# Altium PCB IG-1.PCBDOC (part 2 of 2)
Units mil, origin at the board's own origin, x right, y up, seen from the top; angles counter-clockwise.
Board outline 1834.65 x 964.57 mil, 4 copper layers (Top, GND Plane, Mid1-Ver, Bottom), stack 61.6 mil thick; 29 components, 33 nets, 366 pads, 256 vias.
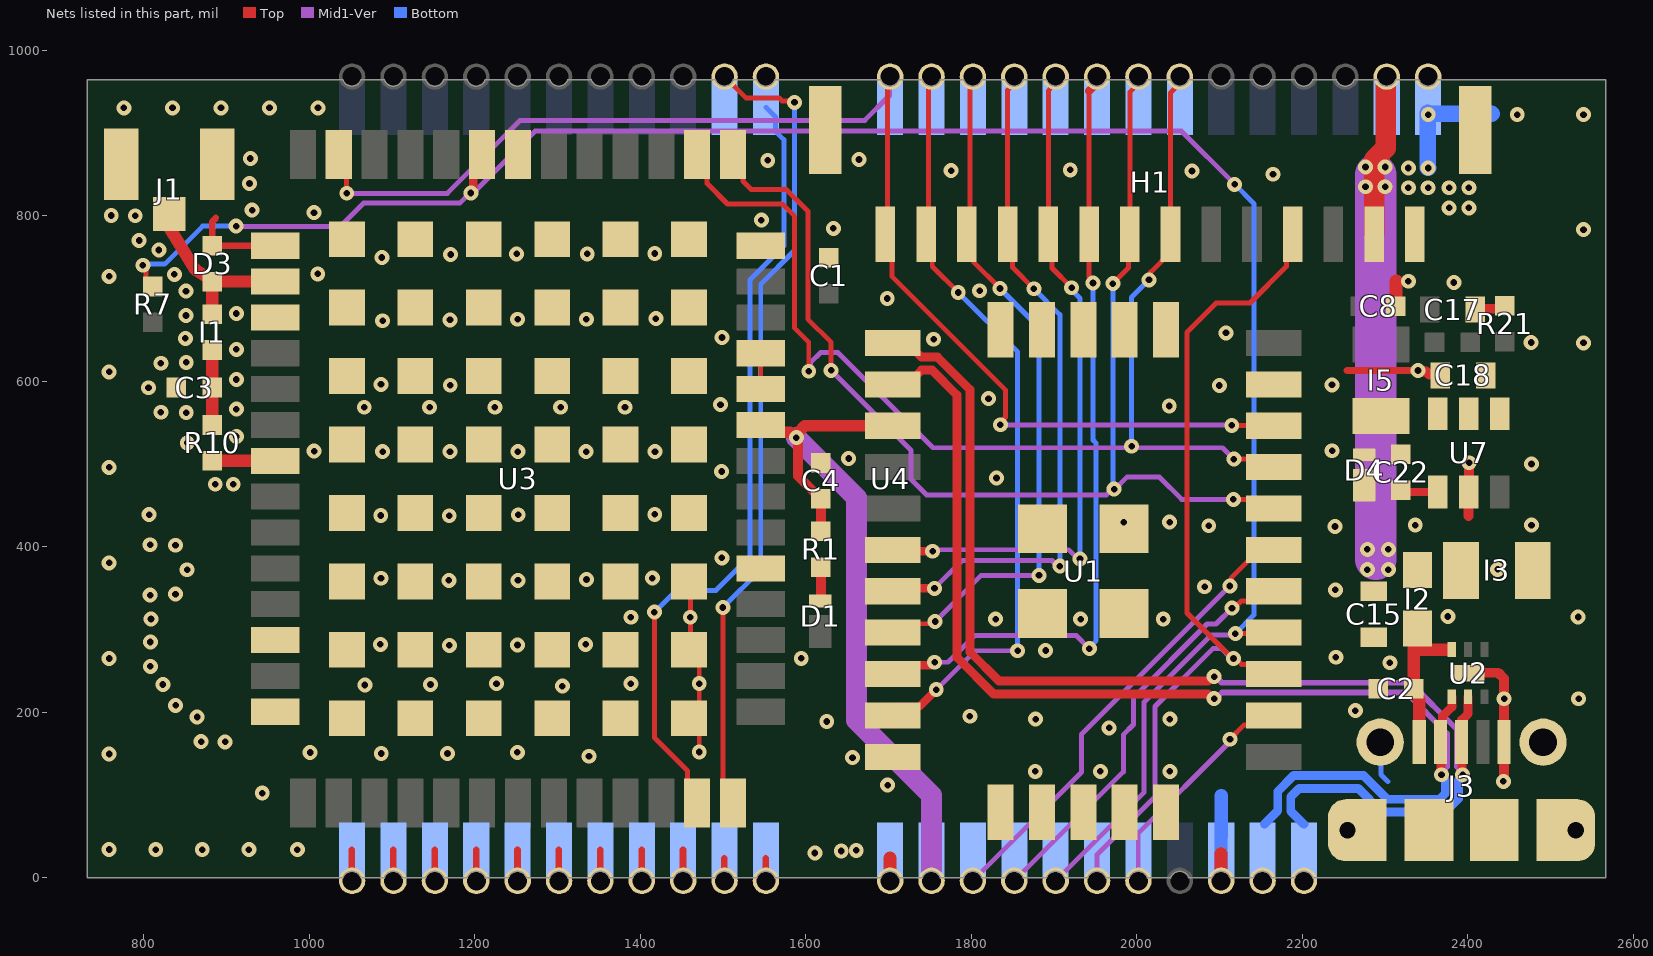
[diagram p4: the nets of this part, all layers, seen from the top]

## Via types
v1: diameter 18, hole 8, Top to Bottom, 256 vias

## Nets (pads, with @x,y where several pads share a name; then routed paths per layer and width w, separated by ;. In a path a pad name is that pad's centre, name@x,y a point inside that pad or via, vN(x,y) a via of type N, cw(c..) or ccw(c..) an arc to the next point about the centre after c; other vN are vias at no path point) (continued)
G3/Tx0: H1.7 U1.19 U3.43 U4.7 | length 1466
  Top w6: U3.43@1469,874.04 1480.74,862.29 1480.74,839.08 1505.54,814.28 1571.75,814.28 1586.8,799.23 1586.8,664.2 1603.76,647.24 v1(1603.76,612.21) ; v1(2014.87,722.51) 2016.79,724.42 2016.79,731.92 2040.82,755.95 2040.82,948.55 2051.87,959.6 U4.7@2051.87,966.09 ; v1(2117.42,505.96) 2163.05,505.96 U1.19@2172.68,496.33
  Mid1-Ver w6: v1(1603.76,612.21) 1605.68,614.12 1605.68,622.32 1617.94,634.59 1639.02,634.59 1753.88,519.72 1991.9,519.72 v1(1993.78,521.6) ; v1@1993.78,519.72 2103.65,519.72 v1(2117.42,505.96)
  Bottom w6: v1(1993.78,521.6) 1993.78,701.41 v1(2014.87,722.51)
G4/Rx0: H1.8 U1.18 U3.42 U4.8 | length 1493.6
  Top w6: U3.42@1512.3,874.04 1524.05,862.29 1524.05,842.03 1534.26,831.82 1576.63,831.82 1602.76,805.69 1602.76,675.17 1630.8,647.13 v1(1630.8,613.14) ; v1@1971.13,471.4 v1(1972.78,469.75) ; v1@1971.13,718.18 1989.78,736.83 1989.78,775.78 H1.8@1991.61,777.61 1991.61,949.34 2001.87,959.6 U4.8@2001.87,966.09 ; v1(2116.7,457.32) 2161.68,457.32 U1.18@2172.68,446.33
  Mid1-Ver w6: v1(1630.8,613.14) 1727.5,516.44 1727.5,481.45 1746.05,462.9 1963.23,462.9 1970.08,469.75 1973.67,469.75 1988.08,484.16 2027.48,484.16 2054.32,457.32 v1(2116.7,457.32)
  Bottom w6: v1@1971.13,471.4 v1@1971.13,718.18
  other v1: 1971.13,718.04
G5/SCLK/STROBE: H1.9 U1.9 U4.9 | length 970.1
  Top w6: 1942.4,950.66 H1.9@1942.4,777.61 1942.5,777.5 1942.5,726.16 1947.16,721.5 v1(1947.16,718.79) ; v1@1942.6,277.28 v1(1942.81,277.08)
  Top w10: U1.9@1698.27,246.33 1709.01,257.08 1750.2,257.08 1753.72,260.6 v1(1755.89,260.6) ; 1942.4,950.66 1951.87,960.14 U4.9@1951.87,966.09
  Mid1-Ver w6: v1(1755.89,260.6) 1772.04,260.6 1804.29,292.85 1927.04,292.85 v1(1942.81,277.08)
  Bottom w6: v1@1942.81,277.49 1942.81,278.64 1950.94,286.76 1950.94,525.26 1947.16,529.04 v1(1947.16,718.79)
G6/Rx1/MOSI: H1.10 U1.6 U4.10 | length 838.6
  Top w6: U4.10@1901.87,966.09 1901.87,959.6 1893.18,950.91 H1.10@1893.18,777.61 1897.72,773.07 1897.72,736.83 v1@1921.39,713.16
  Top w10: U1.6@1698.27,396.33 1699.85,394.75 v1(1753.51,394.75)
  Mid1-Ver w6: v1@1754,394.75 1755.75,396.5 1917.77,396.5 1928.74,385.54 v1(1931.44,385.54)
  Bottom w6: v1@1921.39,713.16 1921.39,710.32 1931.44,700.26 v1(1931.44,385.54)
  other v1: 1921.39,713.02
G7/Tx1/MISO: H1.11 U1.7 U4.11 | length 845.7
  Top w6: U4.11@1851.87,966.09 1851.87,959.6 1843.97,951.7 H1.11@1843.97,777.61 1850.2,771.38 1850.2,737.59 1875.78,712.01 v1(1875.78,711.87)
  Top w10: U1.7@1698.27,346.33 1701.85,349.92 v1(1755.64,349.92)
  Mid1-Ver w6: v1@1756.13,349.92 1756.13,350.41 1789.22,383.5 1897.65,383.5 1904.41,376.75 v1(1907.11,376.75)
  Bottom w6: v1@1875.85,711.94 1875.85,711.8 1907.11,680.54 v1(1907.11,376.75)
G8/C\S\/STROBE: H1.12 U1.8 U4.12 | length 853
  Top w6: U1.8@1698.27,296.33 1709.01,307.08 1751.48,307.08 1754.27,309.86 v1(1756.43,309.86) ; U4.12@1801.87,966.09 1798.31,962.54 1798.31,781.16 H1.12@1794.76,777.61 1802.57,769.8 1802.57,744.54 v1@1834.87,712.24
  Mid1-Ver w6: v1@1755.35,309.86 v1(1756.43,309.86) 1812.07,365.5 v1(1881.9,365.5)
  Bottom w6: v1(1834.79,712.17) 1881.9,665.07 v1(1881.9,365.5)
G9/S\P\I\_\E\N\/STROBE: H1.13 U1.10 U4.13 | length 938.6
  Top w6: U1.10@1692.45,190.51 U1.10@1698.27,196.33 ; U4.13@1751.87,966.09 1748.71,962.93 1748.71,780.77 H1.13@1745.55,777.61 1752.98,770.17 1752.98,738.8 1784.35,707.43 v1(1784.35,707.29)
  Top w10: U1.10@1698.27,196.33 1709.01,207.08 1737.39,207.08 v1(1757.86,227.55)
  Mid1-Ver w6: v1(1757.86,227.55) 1804.8,274.48 v1(1856.15,274.48)
  Bottom w6: v1@1784.42,707.36 1856.15,635.63 v1(1856.15,274.48)
G10/CHIP_ERASE: U1.17 U4.17 | length 567.8
  Top w6: v1(2112.46,352.67) 2114.37,354.58 2114.37,362.63 2148.07,396.33 U1.17@2172.68,396.33
  Mid1-Ver w6: U4.17@1802.09,-3.54 1933.3,127.67 1933.3,173.52 v1(2112.46,352.67)
G11/SWDIO: U1.16 U4.18 | length 510.9
  Top w6: v1(2115.07,325.93) 2117.78,325.93 2126.44,334.58 2160.93,334.58 U1.16@2172.68,346.33
  Mid1-Ver w6: U4.18@1852.09,-3.54 1983.78,128.15 1983.78,173.08 1996.03,185.33 1996.03,217.86 2084.88,306.71 2095.85,306.71 v1(2115.07,325.93)
G13/DRDY/XSDA: H1.4 U1.14 U4.20 | length 1037.4
  Top w6: v1@2115.64,265.12 2060.68,320.09 2060.68,659.2 2096.05,694.57 2136.77,694.57 2181.01,738.81 2181.01,770.16 H1.4@2188.46,777.61 ; v1(2116.99,265.12) 2119.7,265.12 2126.74,258.08 2154.04,258.08 U1.14@2165.79,246.33
  Mid1-Ver w6: U4.20@1952.09,-3.54 1952.09,28.07 2022.03,98.02 2022.03,207.09 2092.34,277.39 2102.02,277.39 2114.29,265.12 v1(2116.99,265.12)
G14/SWCLK: U1.13 U4.21 | length 289.1
  Top w6: v1(2112.65,167.51) 2112.65,167.84 2129.39,184.58 2160.93,184.58 U1.13@2172.68,196.33
  Mid1-Ver w6: U4.21@2001.86,-3.54 2001.86,54.01 2112.65,164.8 v1(2112.65,167.51)
GND: C1.2 C2.2 C3.2 C4.2 C8.2 C15.2 C17.2 C18.2 D3.2 D4.A H1.0 H1.1 J1.2 J1.3 J3.5 J3.6 J3.7 J3.8 J3.9 R21.1 U1.0 U1.11 U1.21 U1.23 U1.24 U2.7 U3.1 U3.3 U3.12 U3.14 U3.32 U3.37 U3.38 U3.41 U3.48 U3.55 U4.1 U4.15 U4.23 U4.37 U4.38 U4.39 U4.40 U4.41 U4.42 U4.43 U4.44 U4.45 U4.46 U4.47 U7.2 | length 1380.8
  Top w6: U3.55@1460.63,277.09 v1(1460.63,314.96) U3.55@1460.63,356.81 ; v1(1471.47,152.09) U3.55@1471.47,180.62 ; U3.55@1471.47,205.25 v1(1471.47,234.77) U3.55@1471.47,263.3 ; U3.37@1545.77,590.57 U3.38@1545.77,633.88 ; v1@1655.85,144.52 v1(1656.62,145.29)
  Top w8: 887.56,797.48 883.07,792.99 D3.2@883.07,763.78 U3.1@959.15,763.8 ; U4.37@1051.86,6.3 1051.86,33.86 ; U4.38@1101.86,6.3 1101.86,33.86 ; U4.39@1151.86,6.3 1151.86,33.86 ; U4.40@1201.86,6.3 1201.86,33.86 ; U4.41@1251.86,6.3 1251.86,33.86 ; U4.42@1301.86,6.3 1301.86,33.86 ; U4.43@1351.86,6.3 1351.86,33.86 ; U4.44@1401.86,6.3 1401.86,33.86 ; U4.45@1451.86,6.3 1451.86,33.86 ; U4.46@1501.86,-3.54 1501.86,24.02 ; U4.47@1551.86,-3.54 1551.86,24.02
  Top w9: 2254.36,613.08 v1@2342.63,613.08
  Top w11.81: v1(2339.75,613.08) 2340.94,611.89 2349.91,611.89 2353.85,607.95
  Top w12: U2.7@2400.37,247.46 2400.83,247.92 2436.71,247.92 2443.74,240.89 v1@2443.74,124.74 ; 2401.09,437.33 U7.2@2401.09,466.22 2401.32,466.45 2401.32,501.41 v1(2401.55,501.65) ; C17.2@2408.96,686.69 2409.95,687.68 2443.41,687.68 R21.1@2444.4,688.66
  Top w16: U4.15@1701.86,-3.54 1701.86,24.02 ; U4.23@2101.86,-3.54 2101.95,29.11 ; C8.2@2313.17,690.61 2313.17,720.74 2313.9,720.74
  Bottom w6: J3.6@2294.09,164.05 J3.6@2299.83,158.31 ; J3.6@2295.12,154.69 2295.12,124.79 2303.32,116.59
  Bottom w16: U4.23@2101.86,-3.54 2102.14,99.62
  Bottom w20: v1(2351.99,857.77) 2351.86,857.9 2351.86,924.21 2352.73,923.34 2428.62,923.34
  other v1: 1611.17,30.12 1643.04,32.57 1661.21,33.33 758.55,34.36 814.8,34.21 871.06,34.21 927.31,34.21 985.94,34.21 943.48,102.5 1699.04,112.21 2443.02,116.68 1877.38,128.72 1956.12,128.72 2040.03,128.72 1338.29,147.05 758.55,149.77 1087.24,150.39 1167.37,150.39 1001.3,151.54 1251.69,151.7 898.68,164.33 869.68,164.64 1966.61,181.37 1625.52,188.99 1877.93,191.82 2040.03,191.83 864.88,194.47 1798.48,195.36 2264.13,202.07 838.94,208.53 2443.85,216.45 2533.91,216.45 1306.11,231.68 1067.44,233.16 823.48,233.73 1146.75,233.7 1226.55,234.77 1388.79,234.77 808.33,255.63 2305.75,259.95 758.55,265.18 1594.68,265.22 2240.64,266.61 1889.92,274.85 1169.53,280.93 1251.95,281.41 1086.27,282.16 1334.13,282.12 808.3,285.07 809.17,312.82 1829.51,312.73 1932.15,312.73 2032.06,312.73 1388.79,314.96 2533.21,315.23 2375.99,315.88 808.01,341.73 838.64,342.83 2239.91,347.97 2082.11,351.78 1169.06,359.53 1252.43,359.53 1335.33,360.61 1086.95,362.11 1414.76,362.16 852.75,372.33 2436.11,372.81 758.55,380.59 1498.78,386.74 838.64,401.95 808.01,402.52 2086.99,425.46 2239.55,424.61 2336.54,426.26 2476.92,426.21 1984.52,429.64 2039.72,429.93 1086.65,437.9 1169.45,437.54 806.86,439 1252.77,438.75 1417.67,439.28 886.74,475.58 908.5,475.59 1830.52,483.25 1498.56,491.03 758.55,496 2476.92,500.11 1651.91,506.75 1089.03,515.05 1170.38,515.05 1252.26,515.05 1334.87,515.05 1417.94,515.05 1006.21,515.71 2236.13,516.08 852.88,525.63 912.31,533.28 851.72,562.11 821.09,562.68 912.31,566.33 1066.76,568.71 1145.81,568.71 1224.5,568.71 1303.99,568.71 1381.8,568.71 2039.31,570.23 1497.13,571.86 1820.91,579.08 806.15,592.24 1170.68,595.19 2099.8,594.89 1087.04,596.25 2235.91,595.74 912.31,602.25 758.55,611.41 821.09,621.8 851.72,622.89 912.31,638.58 2539.77,646.42 2476.53,646.94 1754.59,650.84 850.57,651.8 1498.95,652.92 2107.88,658.55 1088.89,673.1 1170.39,674.27 1252,674.95 1335.15,674.95 1419.09,675.72 851.43,679.56 912.31,681.88 1698.58,700.04 851.41,709 1810.14,709.39 2383.13,719.4 2328.2,720.86 758.55,726.82 837.35,729.17 1010.62,729.83 1088.01,749.61 1171.17,753.16 1250.83,754.03 1336.22,754.03 1417.73,754.42 818.68,758.58 794.85,770.15 2539.77,783.29 1633.54,784.73 1546.57,794.7 761.06,800.3 790.06,799.99 1005.97,803.79 931.26,806.77 2377.43,809.47 2401.22,809.47 2328.21,833.87 2351.99,833.87 2377.43,833.87 2401.22,833.87 928.18,838.93 2164.71,850.21 2066.71,854.11 1775.74,854.54 1919.71,855.41 2328.21,857.77 1554.25,866.93 1664.44,867.98 929.13,869.17 2352.15,922.13 2459.72,922.13 2539.77,922.13 776.41,930.36 835.03,930.36 893.66,930.36 952.29,930.36 1010.91,930.36
GPS1_ANT: D3.1 I1.1 J1.1 U3.2 | length 206.3
  Top w14.9: J1.1@831.2,802.19 829.83,796.43 829.42,794.72 829.42,788.76 861.42,736.69 863.78,734.33 878.7,724.7 D3.1@883.07,720.47 I1.1@883.07,681.1 ; D3.1@894.19,720.49 U3.2@959.15,720.49
GPS1_RX2: U3.26 U4.26 | length 961.1
  Top w6: v1(1417.32,321.05) 1417.32,169.29 1457.25,129.37 1457.25,102.32 U3.26@1469,90.57
  Bottom w6: v1(1417.32,321.05) 1443.48,347.21 1491.43,347.21 1532.76,388.55 1532.76,722.56 1564.72,754.52 ; U4.26@1552.09,931.1 1563.83,919.35 1563.83,901.64 1573.61,891.86 1573.61,763.41 1566.52,756.32
GPS1_TX2: U3.27 U4.27 | length 984.8
  Top w6: v1(1500,326.77) 1500,102.88 U3.27@1512.3,90.57 ; U4.27@1502.09,968.11 1527.7,942.5 1567.83,942.5 1571.41,938.92 1584.7,938.92 v1(1586.61,937.01)
  Bottom w6: v1(1500,326.77) 1545.76,372.53 1545.76,717.18 1586.61,758.03 v1(1586.61,937.01)
GPS.TIMEPULSE: H1.14 U1.20 U3.53 U4.14 | length 1599.9
  Top w6: U3.53@1035.93,874.04 1045.55,864.41 v1(1045.55,827.18) ; U4.14@1701.87,966.09 1699.1,963.32 1699.1,780.38 H1.14@1696.33,777.61 1704.14,769.8 1704.14,726.75 1841.21,589.68 1841.21,556.2 1835.2,550.18 v1(1835.2,547.47) ; v1(2114.78,546.84) 2172.17,546.84 U1.20@2172.68,546.33
  Mid1-Ver w6: v1(1045.55,827.18) 1167.21,827.18 1255.4,915.37 1671.51,915.37 1701.37,945.23 1701.37,967.39 U4.14@1702.09,968.11 ; v1(1835.2,547.47) 1835.27,547.4 v1@2114.78,547.4
GPS_RESET_N: R7.2 U1.15 U3.49 U4.19 | length 2516.7
  Top w6: v1(799.21,740.16) 799.21,737.45 803.21,733.45 803.21,722.38 R7.2@811.02,714.57 ; v1(2119.1,295.21) 2171.56,295.21 U1.15@2172.68,296.33
  Top w10: v1(1195.52,827.44) 1195.52,829.6 1198.41,832.48 1198.41,863.29 U3.49@1209.15,874.04
  Mid1-Ver w6: v1(911.88,787.41) 912.5,786.79 1037.45,786.79 1065.84,815.18 1182.32,815.18 1194.58,827.44 v1(1195.52,827.44) 1198.23,827.44 1273.16,902.37 2053.84,902.37 v1(2118.26,837.95) ; U4.19@1902.09,-3.54 2009.03,103.4 2009.03,212.48 2090.26,293.71 2117.6,293.71 v1(2119.1,295.21)
  Bottom w6: v1(799.21,740.16) 800.6,741.54 825.68,741.54 871.55,787.41 v1(911.88,787.41) ; v1(2118.26,837.95) 2141.75,814.46 2141.75,317.86 v1(2119.1,295.21)
NetC22_1: C22.1 U7.1 | length 48.3
  Top w10: C22.1@2318.59,473.51 2318.59,473.26 2325.63,466.22 U7.1@2363.69,466.22
NetD1_C: D1.C R1.1 | length 40.1
  Top w12: D1.C@1618.46,335.21 R1.1@1618.46,375.31
SW: C22.2 D4.C I5.1 U7.6
USB.D_N: J3.2 U1.2 U2.1 U4.24 | length 1527.3
  Top w10.7: 1782.84,583.41 1782.84,266.5 1827.28,222.06 2086.02,222.06 2091.53,216.55 v1(2093.51,216.55)
  Top w10.73: U1.2@1677.61,596.82 1723.37,596.82 1740.01,613.47 1752.79,613.47 1782.82,583.44 ; v1(2368.15,124.69) 2367.54,125.31 2367.54,163.44 J3.2@2366.92,164.05 2369.43,166.56 2369.43,195.28 2380.68,206.53 U2.1@2380.68,218.92
  Mid1-Ver w6.97: v1(2093.51,216.55) 2095.75,216.55 2103.1,223.91 2325.5,223.91 2374.96,174.45 2374.96,134.29 2368.15,127.48 v1(2368.15,124.69)
  Bottom w10.7: U4.24@2154.16,64.83 2170.41,81.09 2170.41,104.47 2189.9,123.96 2273.92,123.96 2302.73,95.15 2365.9,95.15 2373.09,102.34 2373.09,117.77 2368.15,122.72 v1(2368.15,124.69)
USB.D_P: J3.3 U1.1 U2.2 U4.25 | length 1544.7
  Top w10.7: 1798.54,589.97 1798.54,273 1833.78,237.76 2086.02,237.76 2091.53,243.27 v1(2093.51,243.27)
  Top w10.73: U1.1@1677.61,646.82 1722.38,646.82 1740.01,629.2 1759.31,629.2 1798.54,589.97 ; J3.3@2392.51,164.05 2392.51,190.63 2400.37,198.48 U2.2@2400.37,218.92 ; J3.3@2393.13,164.05 2393.13,125.31 v1(2393.74,124.69)
  Mid1-Ver w6.97: v1(2093.51,243.27) 2095.33,243.27 2102.72,235.88 2330.46,235.88 2386.93,179.41 2386.93,134.29 2393.74,127.48 v1(2393.74,124.69)
  Bottom w10.7: U4.25@2202.04,64.83 2186.11,80.76 2186.11,97.97 2196.4,108.26 2267.42,108.26 2296.22,79.45 2372.41,79.45 2388.79,95.84 2388.79,117.77 2393.74,122.72 v1(2393.74,124.69)
USB.VBUS: C2.1 I2.2 J3.1 U2.6 | length 137.1
  Top w15: I2.2@2334.93,287.48 C2.1@2334.93,228.32 2339.24,224.01 2339.24,217.21 2341.23,215.23 J3.1@2341.23,186.89 ; 2344.19,275.93 U2.6@2378.11,275.93
V_ANT: C3.1 I1.2 R10.2 | length 92.2
  Top w14.9: R10.2@883.07,547.24 883.07,590.55 881.1,592.52 883.07,594.49 I1.2@883.07,637.79
VBAT: C4.1 R1.2 U1.3 U3.36 U4.16 | length 893
  Top w12: v1(1588.77,532) 1589.92,530.85 1589.92,526.61 1590.95,525.58 1590.95,485.49 C4.1@1618.46,457.98 R1.2@1618.46,418.61
  Top w14: U3.36@1551.14,546.6 1559.22,538.52 1581.17,538.52 1587.69,532 v1(1588.77,532) 1588.77,533.08 1590.77,535.08 1590.77,537.93 1598.98,546.14 1691.57,546.14 U1.3@1695.02,549.58
  Top w25: U1.3@1695.02,549.58 U1.3@1698.27,546.33
  Mid1-Ver w25: v1(1588.77,532) 1661.47,459.3 1661.47,190.51 1752.09,99.9 U4.16@1752.09,-3.54
VCC_RF: R10.1 U3.7 | length 76.1
  Top w14.9: R10.1@883.07,503.96 U3.7@959.15,503.96
VIN: C15.1 H1.2 I2.1 I3.1 U4.2 | length 659.6
  Top w25: H1.2@2286.88,777.61 2286.88,867.85 2300.88,881.84 2300.88,965.1 U4.2@2301.87,966.09
  Mid1-Ver w50: 2288.91,384.72 2288.91,849.61
  other v1: 2278.67,372.5 2304.1,372.5 2278.67,397.02 2304.1,397.02 2276.35,834.99 2300.14,834.99 2276.35,858.89 2300.14,858.89
VIN_P: C18.1 I3.2 U7.4 U7.5
pads on no net: J3.4 U2.3 U2.4 U2.5 U3.4 U3.5 U3.6 U3.8 U3.9 U3.10 U3.11 U3.13 U3.15 U3.16 U3.17 U3.18 U3.19 U3.20 U3.21 U3.22 U3.23 U3.24 U3.25 U3.28 U3.29 U3.30 U3.31 U3.35 U3.39 U3.40 U3.44 U3.45 U3.46 U3.47 U3.50 U3.51 U3.52 U3.54 U4.4 U4.28 U4.29 U4.31 U4.32 U4.33 U4.34 U4.35 U4.36

## Polygon pours and split planes (outlines as drawn)
GND on Top "NONET_L-01_P-001" (solid, pour order 12): 2327.78,954.72 2327.78,748.84 2301.36,722.42 2301.36,678.8 2553.66,678.8 2554.63,679.78 2554.63,954.72
GND on Top "GND_L01_P010" (solid, remove dead copper, pour order 10): 749.02,20.35 749.02,944.88 2548.97,944.88 2548.97,20.35
+3.3V on Mid1-Ver "+3.3V_L03_P009" (solid, remove dead copper, pour order 9): 733.25,9.84 733.25,954.72 2550.58,954.72 2550.58,9.84
GND on Bottom "GND_L04_P013" (solid, remove dead copper, pour order 13): 740.43,20.35 740.43,944.88 2548.97,944.88 2548.97,20.35
GND on GND Plane (split plane): 616 vertices, not listed, extent 742.37,10.09 2556.84,954.48

## Other copper
Top:
  region net VIN: 2270.57,336.25 2408.42,336.25 2408.42,406.22 2357.24,406.22 2270.57,406.22
  pour cut-out: 851.9,815.31 851.9,777.97 879.35,777.97 879.35,815.31
  pour cut-out: 898.24,755.27 898.24,729.52 925.7,729.52 925.7,755.27
  pour cut-out: 1637.62,675.11 1637.62,645.87 1653.59,645.87 1654.03,645.43 1654.37,645.77 1654.37,675.11
  pour cut-out: 1581.9,597.03 1581.9,567.78 1597.87,567.78 1598.31,567.34 1598.64,567.68 1598.64,597.03
  region net +3.3V: 2329.55,631.13 2322.8,624.38 2219.33,624.38 2213.03,631.13 2143.8,631.13 2143.8,661.79 2225.86,743.86 2225.86,753 2249.48,753 2249.48,740.91 2291.52,698.88 2291.52,672.55 2332.93,672.55 2332.93,701.46 2371.65,701.46 2371.65,636.72 2366.07,631.13
  region net VIN_P: 2500.34,406.15 2486.38,406.15 2486.38,337.53 2557.86,337.53 2557.86,623.7 2450.3,623.7 2419.16,623.7 2418.91,623.37 2414.34,623.48 2414.56,609.66 2389.28,584.38 2389.28,521.02 2500.34,521.02
  region net SW: 2260.43,602.42 2260.43,507.62 2375.59,507.62 2375.59,576.83 2329.33,576.83 2329.33,602.42
Mid1-Ver:
  region net +3.3V: 2234.62,734.78 2234.62,671.93 2224.77,662.08 2169.31,662.08 2157.79,673.6 2218.98,734.78
Bottom:
  region net +3.3V: 2234.62,734.78 2234.62,671.93 2224.77,662.08 2169.31,662.08 2157.79,673.6 2218.98,734.78

## Silkscreen, mask and mechanical layers (free items; w line width, h text height)
Silkscreen Top:
  region: 2035.16,390.13 cw(c1938.55,390.13) 2035.16,390.27 cw(c2030.93,390.26) 2035.16,390.26 cw(c2030.93,390.26) 2026.71,390.26 ccw(c1938.55,390.13) 2026.71,390.13 cw(c2030.93,390.13)
  region: 1934.4,344.71 1934.4,325.1 1942.81,325.1 1942.81,346
  region: 1938.75,458.22 1926.23,437.03 1934.45,433.41 1934.45,426.06 1942.79,427.07 1942.79,433.43 1950.83,436.85
  region: 1987.08,420.74 1965.89,433.27 1962.27,425.04 1961.29,425.04 1962.29,416.7 1965.71,408.67
  region: 1961.34,425.02 1952.66,424.73 1941.39,423.71 1935.91,422.97 1926.56,421.18 1921.44,419.86 1914.97,417.63 1910.78,415.48 1908.57,414.08 1907.02,412.85 1905.35,411.25 1904.27,409.65 1903.38,408.22 1902.85,406.8 1902.51,405.36 1902.39,403.99 1902.39,402.39 1902.57,401.26 1903.16,399.44 1903.86,397.86 1904.94,396.39 1906.74,394.48 1908.44,393.06 1910.46,391.66 1913.57,390.03 1917.02,388.43 1921.03,386.88 1924.96,385.57 1928.65,384.42 1932.26,383.43 1932.26,392.2 1926.76,393.76 1921.57,395.56 1917.27,397.4 1913.94,399.18 1912.63,400.24 1911.37,401.62 1910.92,402.54 1910.74,403.43 1910.74,404.41 1911.25,405.39 1912.18,406.42 1913.41,407.41 1914.74,408.25 1916.5,409.15 1918.55,410.03 1920.29,410.64 1922.21,411.32 1924.73,411.99 1927.62,412.8 1931.74,413.68 1936.07,414.45 1940.26,415.06 1946.03,415.71 1953.11,416.41 1962.26,416.92
  region: 1934.4,410.84 1934.4,359.9 1942.81,361.18 1942.81,412.13
  region: 1909.85,346.75 1922.19,347.09 1932.95,347.98 1941.28,349.1 1950.63,350.9 1955.75,352.21 1962.22,354.44 1966.41,356.59 1968.62,358 1970.17,359.22 1971.84,360.82 1972.92,362.42 1973.81,363.86 1974.34,365.28 1974.68,366.71 1974.8,368.08 1974.8,369.68 1974.62,370.81 1974.03,372.63 1973.33,374.21 1972.25,375.68 1970.45,377.59 1968.75,379.01 1966.73,380.41 1963.62,382.05 1960.17,383.65 1956.16,385.19 1952.23,386.5 1948.54,387.65 1944.93,388.64 1944.93,379.87 1950.43,378.31 1955.63,376.51 1959.92,374.68 1963.25,372.9 1964.56,371.84 1965.82,370.45 1966.27,369.54 1966.45,368.64 1966.45,367.67 1965.94,366.68 1965.01,365.65 1963.79,364.67 1962.46,363.82 1960.69,362.92 1958.65,362.04 1956.9,361.43 1954.98,360.75 1952.46,360.08 1949.57,359.27 1945.45,358.39 1941.12,357.62 1936.93,357.01 1931.16,356.36 1924.08,355.66 1909.85,355
  lines w12: 1643.52,303.09 1643.52,393.87 ; 1643.73,432.43 1643.73,524.43
  text "IG-1.2.0-G1" at 2557.83,630.43 h65 r90
Silkscreen Bottom:
  text "'.PcbRevision'" at 2375.76,284.86 h80
Dimensions:
  drawing of 295 lines, arcs and shapes, not listed
  text "Layer" at 3112.02,1385.56 h60
  text "Name" at 3521.93,1385.56 h60
  text "Material" at 4691.6,1385.56 h60
  text "Thickness" at 5551.37,1385.56 h60
  text "Constant" at 6201.2,1385.56 h60
  text "Board Layer Stack" at 6771.06,1385.56 h60
  text "Silkscreen Top" at 3521.93,1265.56 h60
  text "Solder Mask Top" at 3521.93,1145.56 h60
  text "Solder Resist" at 4691.6,1145.56 h60
  text "0.40mil" at 5551.37,1145.56 h60
  text "3.5" at 6201.2,1145.56 h60
  text "1" at 3112.02,1025.56 h60
  text "Top" at 3521.93,1025.56 h60
  text "2.10mil" at 5551.37,1025.56 h60
  text "Dielectric1" at 3521.93,905.56 h60
  text "PP-006" at 4691.6,905.56 h60
  text "8.00mil" at 5551.37,905.56 h60
  text "4.1" at 6201.2,905.56 h60
  text "2" at 3112.02,785.56 h60
  text "GND Plane" at 3521.93,785.56 h60
  text "0.70mil" at 5551.37,785.56 h60
  text "Dielectric3" at 3521.93,665.56 h60
  text "Core-009" at 4691.6,665.56 h60
  text "40.00mil" at 5551.37,665.56 h60
  text "4.5" at 6201.2,665.56 h60
  text "3" at 3112.02,545.56 h60
  text "Mid1-Ver" at 3521.93,545.56 h60
  text "0.70mil" at 5551.37,545.56 h60
  text "Dielectric2" at 3521.93,425.56 h60
  text "PP-006" at 4691.6,425.56 h60
  text "8.00mil" at 5551.37,425.56 h60
  text "4.1" at 6201.2,425.56 h60
  text "4" at 3112.02,305.56 h60
  text "Bottom" at 3521.93,305.56 h60
  text "2.10mil" at 5551.37,305.56 h60
  text "Solder Mask Bottom" at 3521.93,185.56 h60
  text "Solder Resist" at 4691.6,185.56 h60
  text "0.40mil" at 5551.37,185.56 h60
  text "3.5" at 6201.2,185.56 h60
  text "Silkscreen Bottom" at 3521.93,65.56 h60
Drill Drawing:
  circle w5: c2565.57,1493.79 r19.44
  lines w5: 2511.51,1185.59 4760.91,1185.59 ; 2511.51,1535.59 4760.91,1535.59 ; 2830.18,1098.09 2830.18,1623.09 ; 3234.57,1098.09 3234.57,1623.09 ; 4016.84,1098.09 4016.84,1623.09 ; 4309.27,1098.09 4309.27,1623.09 ; 2511.51,1098.09 4760.91,1098.09 4760.91,1623.09 2511.51,1623.09 2511.51,1098.09 ; 2546.12,1211.84 2585.01,1211.84 2585.01,1250.73 2546.12,1250.73 2546.12,1211.84 ; 2546.12,1309.07 2555.85,1309.07 2565.57,1299.34 2575.29,1309.07 2585.01,1309.07 2575.29,1318.79 2585.01,1328.51 2575.29,1328.51 2565.57,1338.23 2555.85,1328.51 2546.12,1328.51 2555.85,1318.79 2546.12,1309.07 ; 2546.12,1425.73 2585.01,1425.73 2565.57,1386.84 2546.12,1425.73
  text "Symbol" at 2564.01,1561.84 h42
  text "Hit Count" at 2856.43,1561.84 h42
  text "Finished Hole Size" at 3260.82,1561.84 h42
  text "Plated" at 4043.09,1561.84 h42
  text "Hole Type" at 4335.52,1561.84 h42
  text "2" at 2856.43,1474.34 h35
  text "19.69mil (0.500mm)" at 3260.82,1474.34 h35
  text "PTH" at 4043.09,1474.34 h35
  text "Slot" at 4335.52,1474.34 h35
  text "2" at 2856.43,1386.84 h35
  text "33.47mil (0.850mm)" at 3260.82,1386.84 h35
  text "PTH" at 4043.09,1386.84 h35
  text "Round" at 4335.52,1386.84 h35
  text "47" at 2856.43,1299.34 h35
  text "23.00mil (0.584mm)" at 3260.82,1299.34 h35
  text "PTH" at 4043.09,1299.34 h35
  text "Round" at 4335.52,1299.34 h35
  text "256" at 2856.43,1211.84 h35
  text "8.00mil (0.203mm)" at 3260.82,1211.84 h35
  text "PTH" at 4043.09,1211.84 h35
  text "Round" at 4335.52,1211.84 h35
  text "307 Total" at 2856.43,1124.34 h35
  text "Slot definitions :" at 2564.01,1041.44 h35
  text "Routed Path Length" at 3164.07,1041.44 h35
  text "= Calculated from tool start centre position to tool end centre position." at 3804.96,1041.44 h35
  text "Hole Length" at 3164.07,984.79 h35
  text "= Routed Path Length + Tool Size = Slot length as defined in the PCB layout" at 3565.87,984.79 h35
Board Outline:
  lines w5: 2566.7,964.57 2362.8,964.57 cw(c2351.86,968.11) 2340.92,964.57 2312.8,964.57 cw(c2301.86,968.11) 2290.92,964.57 2262.8,964.57 cw(c2251.86,968.11) 2240.92,964.57 2212.8,964.57 cw(c2201.86,968.11) 2190.92,964.57 2162.8,964.57 cw(c2151.86,968.11) 2140.92,964.57 2112.8,964.57 cw(c2101.86,968.11) 2090.92,964.57 2062.8,964.57 cw(c2051.86,968.11) 2040.92,964.57 2012.8,964.57 cw(c2001.86,968.11) 1990.92,964.57 1962.8,964.57 cw(c1951.86,968.11) 1940.92,964.57 1912.8,964.57 cw(c1901.86,968.11) 1890.92,964.57 1862.8,964.57 cw(c1851.86,968.11) 1840.92,964.57 1812.8,964.57 cw(c1801.86,968.11) 1790.92,964.57 1762.8,964.57 cw(c1751.86,968.11) 1740.92,964.57 1712.8,964.57 cw(c1701.86,968.11) 1690.92,964.57 1562.8,964.57 cw(c1551.86,968.11) 1540.92,964.57 1512.8,964.57 cw(c1501.86,968.11) 1490.92,964.57 1462.8,964.57 cw(c1451.86,968.11) 1440.92,964.57 1412.8,964.57 cw(c1401.86,968.11) 1390.92,964.57 1362.8,964.57 cw(c1351.86,968.11) 1340.92,964.57 1312.8,964.57 cw(c1301.86,968.11) 1290.92,964.57 1262.8,964.57 cw(c1251.86,968.11) 1240.92,964.57 1212.8,964.57 cw(c1201.86,968.11) 1190.92,964.57 1162.8,964.57 cw(c1151.86,968.11) 1140.92,964.57 1112.8,964.57 cw(c1101.86,968.11) 1090.92,964.57 1062.8,964.57 cw(c1051.86,968.11) 1040.92,964.57 732.28,964.57 732.28,0 1012.8,0 1040.92,0 cw(c1051.86,-3.54) 1062.8,0 1090.92,0 cw(c1101.86,-3.54) 1112.8,0 1140.92,0 cw(c1151.86,-3.54) 1162.8,0 1190.92,0 cw(c1201.86,-3.54) 1212.8,0 1240.92,0 cw(c1251.86,-3.54) 1262.8,0 1290.92,0 cw(c1301.86,-3.54) 1312.8,0 1340.92,0 cw(c1351.86,-3.54) 1362.8,0 1390.92,0 cw(c1401.86,-3.54) 1412.8,0 1440.92,0 cw(c1451.86,-3.54) 1462.8,0 1490.92,0 cw(c1501.86,-3.54) 1512.8,0 1540.92,0 cw(c1551.86,-3.54) 1562.8,0 1690.92,0 cw(c1701.86,-3.54) 1712.8,0 1740.92,0 cw(c1751.86,-3.54) 1762.8,0 1790.92,0 cw(c1801.86,-3.54) 1812.8,0 1840.92,0 cw(c1851.86,-3.54) 1862.8,0 1890.92,0 cw(c1901.86,-3.54) 1912.8,0 1940.92,0 cw(c1951.86,-3.54) 1962.8,0 1990.92,0 cw(c2001.86,-3.54) 2012.8,0 2040.92,0 cw(c2051.86,-3.54) 2062.8,0 2090.92,0 cw(c2101.86,-3.54) 2112.8,0 2140.92,0 cw(c2151.86,-3.54) 2162.8,0 2190.92,0 cw(c2201.86,-3.54) 2212.8,0 2566.93,0 2566.93,964.57

## Dimensions
2566.93,0 to 2566.7,964.57 on Dimensions
732.28,0 to 2566.93,0 on Dimensions

## Text inside footprints (layer, text, board x,y; h text height)
U1: Silkscreen Top "1" at 1747.4,634.52 h40; Silkscreen Top "11" at 1747.4,134.52 h40; Silkscreen Top "12" at 2086.06,134.52 h40; Silkscreen Top "22" at 2085,634.52 h40
U3: Silkscreen Bottom "26" at 2138.29,-1082.89 h45
U4: Silkscreen Bottom "C" at 2357.99,234.96 h30; Silkscreen Bottom "2024" at 2322.12,229.17 h50; Silkscreen Bottom "47" at 1538.98,78.74 h45 r270; Silkscreen Bottom "37" at 1038.98,78.74 h45 r270; Silkscreen Bottom "26" at 1565.2,885.83 h45 r90; Silkscreen Bottom "36" at 1065.2,885.83 h45 r90; Silkscreen Bottom "SENSE" at 1130.65,235.87 h80; Silkscreen Bottom "INERTIAL" at 1462.85,235.94 h80; Silkscreen Bottom "IS-IG-1.2" at 2358.66,687.58 h150; Silkscreen Bottom "1" at 2338.58,866.14 h45 r270; Silkscreen Bottom "14" at 1688.98,846.46 h45 r270; Silkscreen Bottom "25" at 2188.98,78.74 h45 r270; Silkscreen Bottom "15" at 1688.98,78.74 h45 r270